# Altium PCB PCB.PcbDoc (part 3 of 3)
Units mil, origin at the board's own origin, x right, y up, seen from the top; angles counter-clockwise.
Board outline 6000 x 4000 mil, 2 copper layers (Top Layer, Bottom Layer); 304 components, 223 nets, 979 pads, 30 vias.
Unrouted connection lines stored in the file: 566.
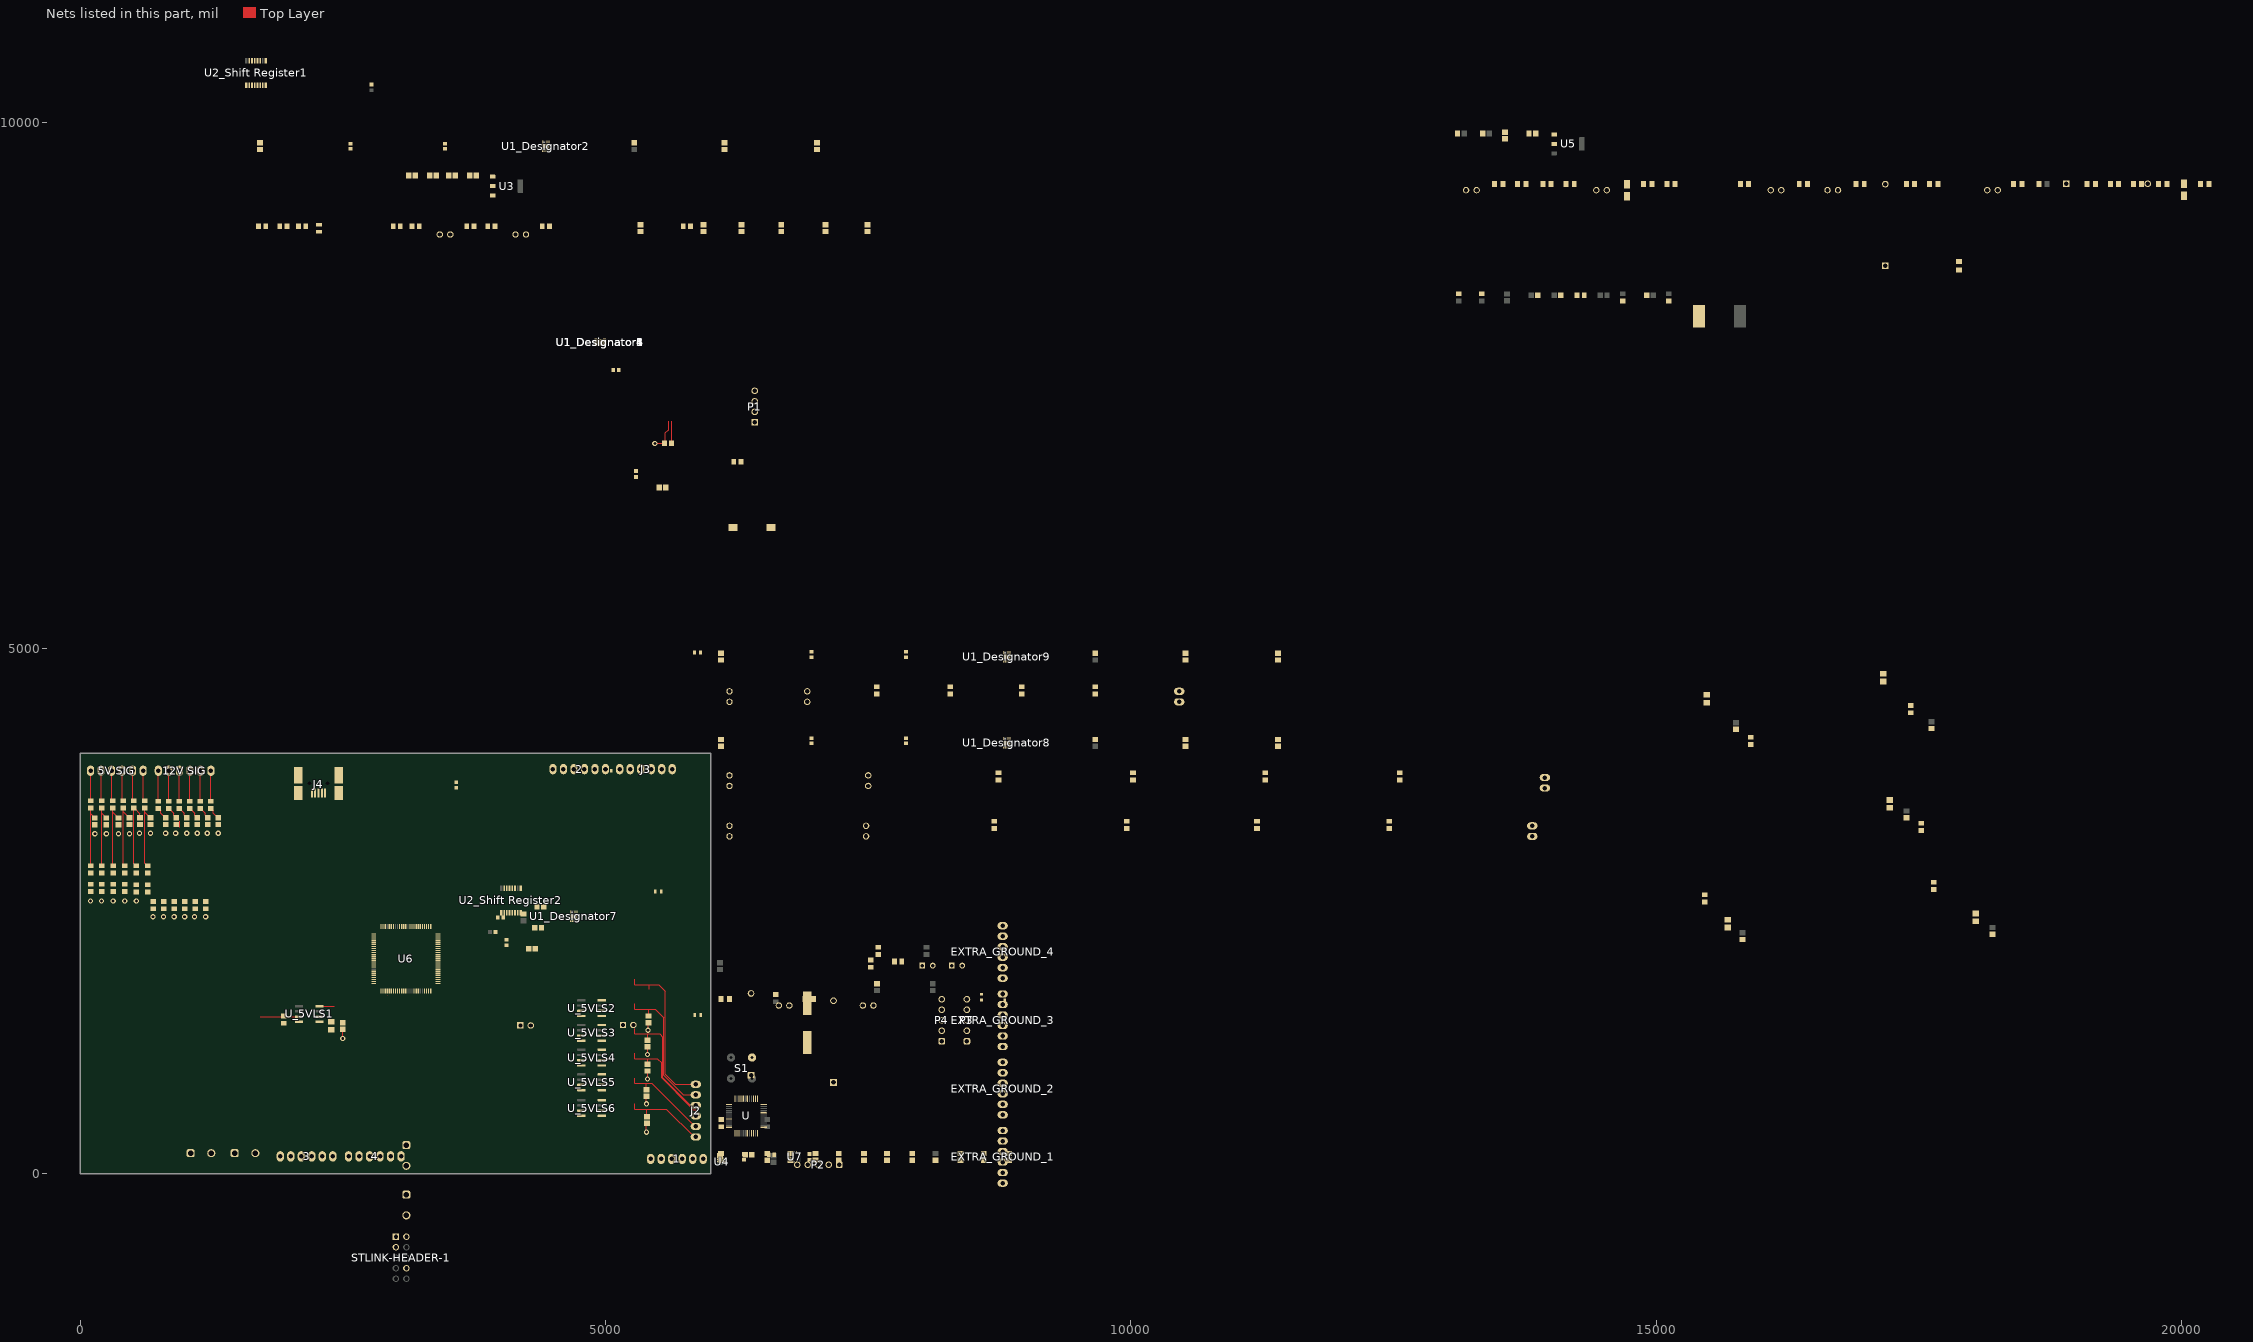
[diagram p2: the nets of this part, all layers, seen from the top]

## Via types
v1: diameter 50, hole 28, Top Layer to Bottom Layer, 30 vias

## Nets (pads, with @x,y where several pads share a name; then routed paths per layer and width w, separated by ;. In a path a pad name is that pad's centre, name@x,y a point inside that pad or via, vN(x,y) a via of type N, cw(c..) or ccw(c..) an arc to the next point about the centre after c; other vN are vias at no path point) (continued)
"Net5V SIG_5": (continued)
  Top Layer w5: 500,3835 500,3560 R1_Designator2.2@510,3550
"Net5V SIG_6": "5V SIG.6" R1_Designator1.2 | length 291.8
  Top Layer w5: 600,3835 600,3564.45 R1_Designator1.2@615,3549.45
"Net12V SIG_1": "12V SIG.1" R4_6.2 | length 290.6
  Top Layer w5: R4_6.2@745,3544.45 745,3835
"Net12V SIG_2": "12V SIG.2" R4_5.2 | length 290.6
  Top Layer w5: R4_5.2@845,3544.45 845,3835
"Net12V SIG_3": "12V SIG.3" R4_4.2 | length 290.6
  Top Layer w5: R4_4.2@945,3544.45 945,3835
"Net12V SIG_4": "12V SIG.4" R4_3.2 | length 290.6
  Top Layer w5: R4_3.2@1045,3544.45 1045,3835
"Net12V SIG_5": "12V SIG.5" R4_2.2 | length 290.6
  Top Layer w5: R4_2.2@1145,3544.45 1145,3835
"Net12V SIG_6": "12V SIG.6" R4_1.2 | length 290.6
  Top Layer w5: R4_1.2@1245,3544.45 1245,3835
NetC5_Designator1_2: C5_Designator1.2 J3.6 R11_Designator1.1 U1_Designator1.8
NetC5_Designator2_2: C5_Designator2.2 J3.5 R11_Designator2.1 U1_Designator2.8
NetC5_Designator3_2: C5_Designator3.2 J3.4 R11_Designator3.1 U1_Designator3.8
NetC5_Designator4_2: C5_Designator4.2 J3.3 R11_Designator4.1 U1_Designator4.8
NetC5_Designator5_2: C5_Designator5.2 J3.2 R11_Designator5.1 U1_Designator5.8
NetC5_Designator6_2: C5_Designator6.2 J3.1 R11_Designator6.1 U1_Designator6.8
NetC5_Designator7_2: "J1_Motor Controller 1.1" "R6_Motor Controller 1.2" C5_Designator7.2 R11_Designator7.1 U1_Designator7.8
NetC5_Designator8_2: "J1_Motor Controller 2.1" "R6_Motor Controller 2.2" C5_Designator8.2 R11_Designator8.1 U1_Designator8.8
NetC5_Designator9_2: C5_Designator9.2 J1_Steering.1 R6_Steering.2 R11_Designator9.1 U1_Designator9.8
NetC8_5VLS1_2: C8_5VLS1.2 J2.1 U_5VLS1.6 | length 1545.4
  Top Layer w5: 5280,1850 5280,1800 5415,1800 ; 5415,1755 5415,1800 ; J2.1@5850,860 J2.1@5860,850 5665,850 5570,945 5570,1735 5505,1800 5415,1800
NetC8_5VLS2_2: C8_5VLS2.2 J2.2 U_5VLS2.6 | length 1354.9
  Top Layer w5: 5279.88,1615 5279.88,1565 5410,1565 ; C8_5VLS2.2@5410,1500 5410,1565 ; J2.2@5860,750 5740,750 5555,935 5555,1485 5475,1565 5410,1565
NetC8_5VLS3_2: C8_5VLS3.2 J2.3 U_5VLS3.6 | length 1196.9
  Top Layer w5: 5279.88,1380 5279.88,1330 5397.44,1330 ; C8_5VLS3.2@5400,1271.5 5400,1327.44 5397.44,1330 ; J2.3@5860,650 5853.29,656.71 5803.29,656.71 5545,915 5545,1300 5515,1330 5397.44,1330
NetC8_5VLS4_2: C8_5VLS4.2 J2.4 U_5VLS4.6 | length 1030.7
  Top Layer w5: 5280,1145 5280,1095 5400,1095 ; C8_5VLS4.2@5400,1040 5400,1095 ; J2.4@5860,550 5860,605.12 5858.54,606.59 5857.07,608.05 5845.24,608.05 cw(c5845.24,650) 5803.94,642.61 ccw(c5799.02,641.71) 5799.15,646.71 5535,910.86 5535,1055 5495,1095 5400,1095
NetC8_5VLS5_2: C8_5VLS5.2 J2.5 U_5VLS5.6 | length 861.9
  Top Layer w5: 5280,910 5280,860 5395,860 ; C8_5VLS5.2@5390,800 5390,855 5395,860 ; J2.5@5860,450 5850,450 5440,860 5395,860
NetC8_5VLS6_2: C8_5VLS6.2 J2.6 U_5VLS6.6 | length 813.3
  Top Layer w5: 5280,665 5280,615 5395,615 ; C8_5VLS6.2@5395,541.5 5395,615 ; J2.6@5860,350 5845.24,350 5580.24,615 5395,615
NetC14_1: C14.1 R49.1 R53.2 U4.6
NetC23_1: C23.1 U6.48
NetC24_1: C24.1 U6.73
NetC25_1: C25.1 U6.12 Y1.2
NetC27_1: C27.1 U6.13 Y1.1
NetC40_1: C40.1 U7.14
"NetDS1_Motor Controller 1_1": "DS1_Motor Controller 1.1" "R8_Motor Controller 1.1"
"NetDS1_Motor Controller 2_1": "DS1_Motor Controller 2.1" "R8_Motor Controller 2.1"
NetDS1_Steering_1: DS1_Steering.1 R8_Steering.1
"NetDS2_Motor Controller 1_1": "DS2_Motor Controller 1.1" "R9_Motor Controller 1.1"
"NetDS2_Motor Controller 2_1": "DS2_Motor Controller 2.1" "R9_Motor Controller 2.1"
NetDS2_Steering_1: DS2_Steering.1 R9_Steering.1
NetDS3_1: DS3.1 R19.2
NetDS4_2: DS4.2 R21.2
NetDS5_1: DS5.1 R32.1
NetDS6_1: DS6.1 R35.1
NetDS7_1: DS7.1 R40.1
NetDS8_1: DS8.1 R43.1
NetDS9_1: DS9.1 R48.1
NetDS10_2: DS10.2 R56.2
NetDS11_2: DS11.2 R57.2
NetDS12_1: DS12.1 R59.1
NetDS13_1: DS13.1 R61.1
NetJ4_1: J4.1 USB5V_FB-100R@100Mhz.2
NetJ4_4: J4.4 R16.2 | length 209.9
  Top Layer w5: R16.2@5629.45,6950 5632.4,6952.95 5632.4,7158.66
NetJ7_1: J7.1 U6.86
NetJ7_2: J7.2 U6.87
NetJ8_1: J8.1 U6.23
NetJ8_2: J8.2 U6.24
NetL1_1: L1.1 U4.2
NetP2_1: P2.1 U6.38
NetP2_2: P2.2 U6.39
NetP2_3: P2.3 U6.65
NetP2_4: P2.4 U6.66
NetR2_Designator1_1: R2_Designator1.1 R3_Designator1.2
NetR2_Designator2_1: R2_Designator2.1 R3_Designator2.2
NetR2_Designator3_1: R2_Designator3.1 R3_Designator3.2
NetR2_Designator4_1: R2_Designator4.1 R3_Designator4.2
NetR2_Designator5_1: R2_Designator5.1 R3_Designator5.2
NetR2_Designator6_1: R2_Designator6.1 R3_Designator6.2
"NetR6_Motor Controller 1_1": "R6_Motor Controller 1.1" "R8_Motor Controller 1.2"
"NetR6_Motor Controller 2_1": "R6_Motor Controller 2.1" "R8_Motor Controller 2.2"
NetR6_Steering_1: R6_Steering.1 R8_Steering.2
"NetR7_Motor Controller 1_1": "R7_Motor Controller 1.1" "R9_Motor Controller 1.2"
"NetR7_Motor Controller 2_1": "R7_Motor Controller 2.1" "R9_Motor Controller 2.2"
NetR7_Steering_1: R7_Steering.1 R9_Steering.2
NetR10_Designator1_1: R10_Designator1.1 U1_Designator1.6
NetR10_Designator2_1: R10_Designator2.1 U1_Designator2.6
NetR10_Designator3_1: R10_Designator3.1 U1_Designator3.6
NetR10_Designator4_1: R10_Designator4.1 U1_Designator4.6
NetR10_Designator5_1: R10_Designator5.1 U1_Designator5.6
NetR10_Designator6_1: R10_Designator6.1 U1_Designator6.6
NetR10_Designator7_1: R10_Designator7.1 U1_Designator7.6
NetR10_Designator8_1: R10_Designator8.1 U1_Designator8.6
NetR10_Designator9_1: R10_Designator9.1 U1_Designator9.6
NetR11_Designator1_2: R11_Designator1.2 U1_Designator1.5
NetR11_Designator2_2: R11_Designator2.2 U1_Designator2.5
NetR11_Designator3_2: R11_Designator3.2 U1_Designator3.5
NetR11_Designator4_2: R11_Designator4.2 U1_Designator4.5
NetR11_Designator5_2: R11_Designator5.2 U1_Designator5.5
NetR11_Designator6_2: R11_Designator6.2 U1_Designator6.5
NetR11_Designator7_2: R11_Designator7.2 U1_Designator7.5
NetR11_Designator8_2: R11_Designator8.2 U1_Designator8.5
NetR11_Designator9_2: R11_Designator9.2 U1_Designator9.5
NetR12_5VLS1_1: "U2_Shift Register1.15" R12_5VLS1.1 U_5VLS1.3 | length 367.6
  Top Layer w5: 1715,1495 1865,1495 U_5VLS1.3@2082.56,1495
NetR12_5VLS2_1: "U2_Shift Register1.1" R12_5VLS2.1 U_5VLS2.3
NetR12_5VLS3_1: "U2_Shift Register1.2" R12_5VLS3.1 U_5VLS3.3
NetR12_5VLS4_1: "U2_Shift Register1.3" R12_5VLS4.1 U_5VLS4.3
NetR12_5VLS5_1: "U2_Shift Register1.4" R12_5VLS5.1 U_5VLS5.3
NetR12_5VLS6_1: "U2_Shift Register1.5" R12_5VLS6.1 U_5VLS6.3
NetR13_5VLS1_2: R13_5VLS1.2 U_5VLS1.5
NetR13_5VLS2_2: R13_5VLS2.2 U_5VLS2.5
NetR13_5VLS3_2: R13_5VLS3.2 U_5VLS3.5
NetR13_5VLS4_2: R13_5VLS4.2 U_5VLS4.5
NetR13_5VLS5_2: R13_5VLS5.2 U_5VLS5.5
NetR13_5VLS6_2: R13_5VLS6.2 U_5VLS6.5
NetR20_1: R20.1 R22.2 U.10
NetR24_2: R24.2 U.3
NetR25_2: R25.2 STLINK-HEADER-1.2 U6.72
NetR26_2: R26.2 STLINK-HEADER-1.1 U6.76
NetR27_2: R27.2 U.2
NetR28_1: R28.1 R29.2
NetR29_1: R29.1 R30.2
NetR30_1: R30.1 R31.2
NetR31_1: R31.1 R32.2
NetR33_1: R33.1 R36.2
NetR34_1: R34.1 R37.2
NetR35_2: R35.2 R38.1
NetR36_1: R36.1 R39.2
NetR37_1: R37.1 R40.2
NetR39_1: R39.1 R41.2
NetR41_1: R41.1 R42.2
NetR42_1: R42.1 R43.2
NetR44_1: R44.1 R45.2
NetR45_1: R45.1 R46.2
NetR46_1: R46.1 R47.2
NetR47_1: R47.1 R48.2
NetR50_1: R50.1 U4.4
NetR51_1: R51.1 R52.2 U4.5
NetR54_2: R54.2 U6.93
NetR55_2: R55.2 U6.92
NetR58_2: R58.2 U6.94
NetR59_2: R59.2 R60.1
NetR60_2: R60.2 U6.61
NetR61_2: R61.2 R62.1
NetR62_2: R62.2 U6.62
NetR64_CAN1_2: R64_CAN1.2
NetR64_CAN2_2: R64_CAN2.2
NetU1_Designator1_2: "U2_Shift Register2.5" U1_Designator1.2
NetU1_Designator2_2: "U2_Shift Register2.4" U1_Designator2.2
NetU1_Designator3_2: "U2_Shift Register2.3" U1_Designator3.2
NetU1_Designator4_2: "U2_Shift Register2.2" U1_Designator4.2
NetU1_Designator5_2: "U2_Shift Register2.1" U1_Designator5.2
NetU1_Designator6_2: "U2_Shift Register2.15" U1_Designator6.2
"NetU2_Shift Register1_6": "U2_Shift Register1.6"
"NetU2_Shift Register1_7": "U2_Shift Register1.7"
"NetU2_Shift Register1_9": "U2_Shift Register1.9"
"NetU2_Shift Register2_6": "U2_Shift Register2.6"
"NetU2_Shift Register2_7": "U2_Shift Register2.7"
"NetU2_Shift Register2_9": "U2_Shift Register2.9"
NRST_n: C28.2 S1.2 U6.14
RST: DEBUG5.2 R17.1 SW1.1 U.7
ST_JTCK: P1.4 U.37
ST_JTMS: P1.3 U.34
STEERING_ENABLE: U1_Designator9.2 U6.46
STLINK_LED: R19.1 R21.1 U.30
T_JTCK: R26.1 U.26
T_JTMS: R23.1 R25.1 U.27
T_SWDIO_IN: R23.2 U.25
UART_RX: R55.1 U.13
UART_TX: R54.1 U.12
USB_5V: C10.2 C11.2 DS10.1 U3.3 USB5V_FB-100R@100Mhz.1
USB_D_N: J4.2 U.32
USB_D_P: J4.3 R15.1 U.33
VCC3V3: C6_Designator1.2 C6_Designator2.2 C6_Designator3.2 C6_Designator4.2 C6_Designator5.2 C6_Designator6.2 C6_Designator7.2 C6_Designator8.2 C6_Designator9.2 C20.2 C21.2 C26_CAN1.2 C26_CAN2.2 C30.2 C31.2 C32.2 C33.2 C34.2 C35.2 C36.2 C37.2 C41.2 C42.2 C43.2 C44.2 P1.2 R10_Designator1.2 R10_Designator2.2 R10_Designator3.2 R10_Designator4.2 R10_Designator5.2 R10_Designator6.2 R10_Designator7.2 R10_Designator8.2 R10_Designator9.2 R12_5VLS1.2 R12_5VLS2.2 R12_5VLS3.2 R12_5VLS4.2 R12_5VLS5.2 R12_5VLS6.2 R15.2 R17.2 R38.2 U1_Designator1.3 U1_Designator2.3 U1_Designator3.3 U1_Designator4.3 U1_Designator5.3 U1_Designator6.3 U1_Designator7.3 U1_Designator8.3 U1_Designator9.3 U5.2 U6.6 U6.11 U6.19 U6.21 U6.22 U6.28 U6.50 U6.75 U6.100 U7.1 U7.16 U.1 U.9 U.24 U.36 U.48
VCC3V3DEBUG: C12.2 C13.2 DEBUG1.2 DEBUG2.2 DEBUG3.2 DEBUG4.2 DEBUG.2 DS4.1 DS11.1 R20.2 U3.2
VCC12V: "R7_Motor Controller 1.2" "R7_Motor Controller 2.2" C1_Designator1.1 C1_Designator2.1 C1_Designator3.1 C1_Designator4.1 C1_Designator5.1 C1_Designator6.1 C1_Designator7.1 C1_Designator8.1 C1_Designator9.1 C4_Designator1.1 C4_Designator2.1 C4_Designator3.1 C4_Designator4.1 C4_Designator5.1 C4_Designator6.1 C4_Designator7.1 C4_Designator8.1 C4_Designator9.1 C15.2 C16.2 D1.1 D2.1 J5.2 J6.2 R7_Steering.2 R14.2 R28.2 R33.2 R44.2 R51.2 U1_Designator1.1 U1_Designator1.9 U1_Designator2.1 U1_Designator2.9 U1_Designator3.1 U1_Designator3.9 U1_Designator4.1 U1_Designator4.9 U1_Designator5.1 U1_Designator5.9 U1_Designator6.1 U1_Designator6.9 U1_Designator7.1 U1_Designator7.9 U1_Designator8.1 U1_Designator8.9 U1_Designator9.1 U1_Designator9.9 U4.1
pads on no net: C29.2 J4.MH1 J4.MH2 R63_CAN1.1 R63_CAN1.2 R63_CAN2.1 R63_CAN2.2 S1.3 S1.4 STLINK-HEADER-1.4 STLINK-HEADER-1.5 STLINK-HEADER-1.6 STLINK-HEADER-1.7 STLINK-HEADER-1.9 STLINK-HEADER-1.10 U1_Designator1.7 U1_Designator2.7 U1_Designator3.7 U1_Designator4.7 U1_Designator5.7 U1_Designator6.7 U1_Designator7.7 U1_Designator8.7 U1_Designator9.7 U3.4 U5.4 U6.37 U6.42 U6.43 U6.47 U6.68 U6.89 U6.90 U6.91 U6.95 U6.96 U7.7 U7.9 U7.10 U7.11 U7.12 U7.15 U.4 U.5 U.6 U.11 U.14 U.15 U.16 U.17 U.18 U.19 U.21 U.22 U.28 U.29 U.31 U.38 U.39 U.40 U.41 U.42 U.43 U.45 U.46 U_5VLS1.7 U_5VLS2.7 U_5VLS3.7 U_5VLS4.7 U_5VLS5.7 U_5VLS6.7

## Polygon pours and split planes (outlines as drawn)
GND on Top Layer "GND_L01_P006" (solid, pour order 6): 645,2547.5 645,2405 1245,2405 1245,2552.5
GND on Top Layer "GND_L01_P005" (solid, pour order 5): 35,2715 35,2555 615,2555 700,2715
GND on Top Layer "GND_L01_P001" (solid, pour order 1): 90,3355 90,3190 1365,3190 1365,3355
GND on Bottom Layer "GND_L02_P000" (solid, pour order 0): -490,2360 -645,2515 -645,4345 135,4345 585,4795 755,4625 7625,4625 7625,-725 7350,-1000 -980,-1000

## Silkscreen, mask and mechanical layers (free items; w line width, h text height)
Top Overlay:
  drawing of 13 lines, arcs and shapes, not listed
  text "R1-300K" at 1330,3510 h60
  text "C2-0.1uF" at 1380,3335 h60
  text "R2-300K" at 715,2865 h60
  text "R3-150K" at 725,2690 h60
  text "R5-100K" at 1285,2500 h60

## Text inside footprints (layer, text, board x,y; h text height)
P2: Top Overlay "1" at 7229.72,18.07 h40 r180; Top Overlay "5" at 6839.96,18.07 h40 r180
P3: Top Overlay "1" at 8373.07,1255.28 h40 r90; Top Overlay "5" at 8373.07,1645.04 h40 r90
P4: Top Overlay "1" at 8133.07,1255.28 h40 r90; Top Overlay "5" at 8133.07,1645.04 h40 r90